# Altium PCB TIE_2025.PcbDoc (part 1 of 2)
Units mm, origin at the board's own origin, x right, y up, seen from the top; angles counter-clockwise.
Board outline 85 x 56.03 mm, 6 copper layers (Top Layer, L2-GND, L3-PWR, L4-SGN, L5-GND, Bottom Layer), stack 1.452 mm thick; 135 components, 108 nets, 850 pads, 109 vias.
Unrouted connection lines stored in the file: 482.
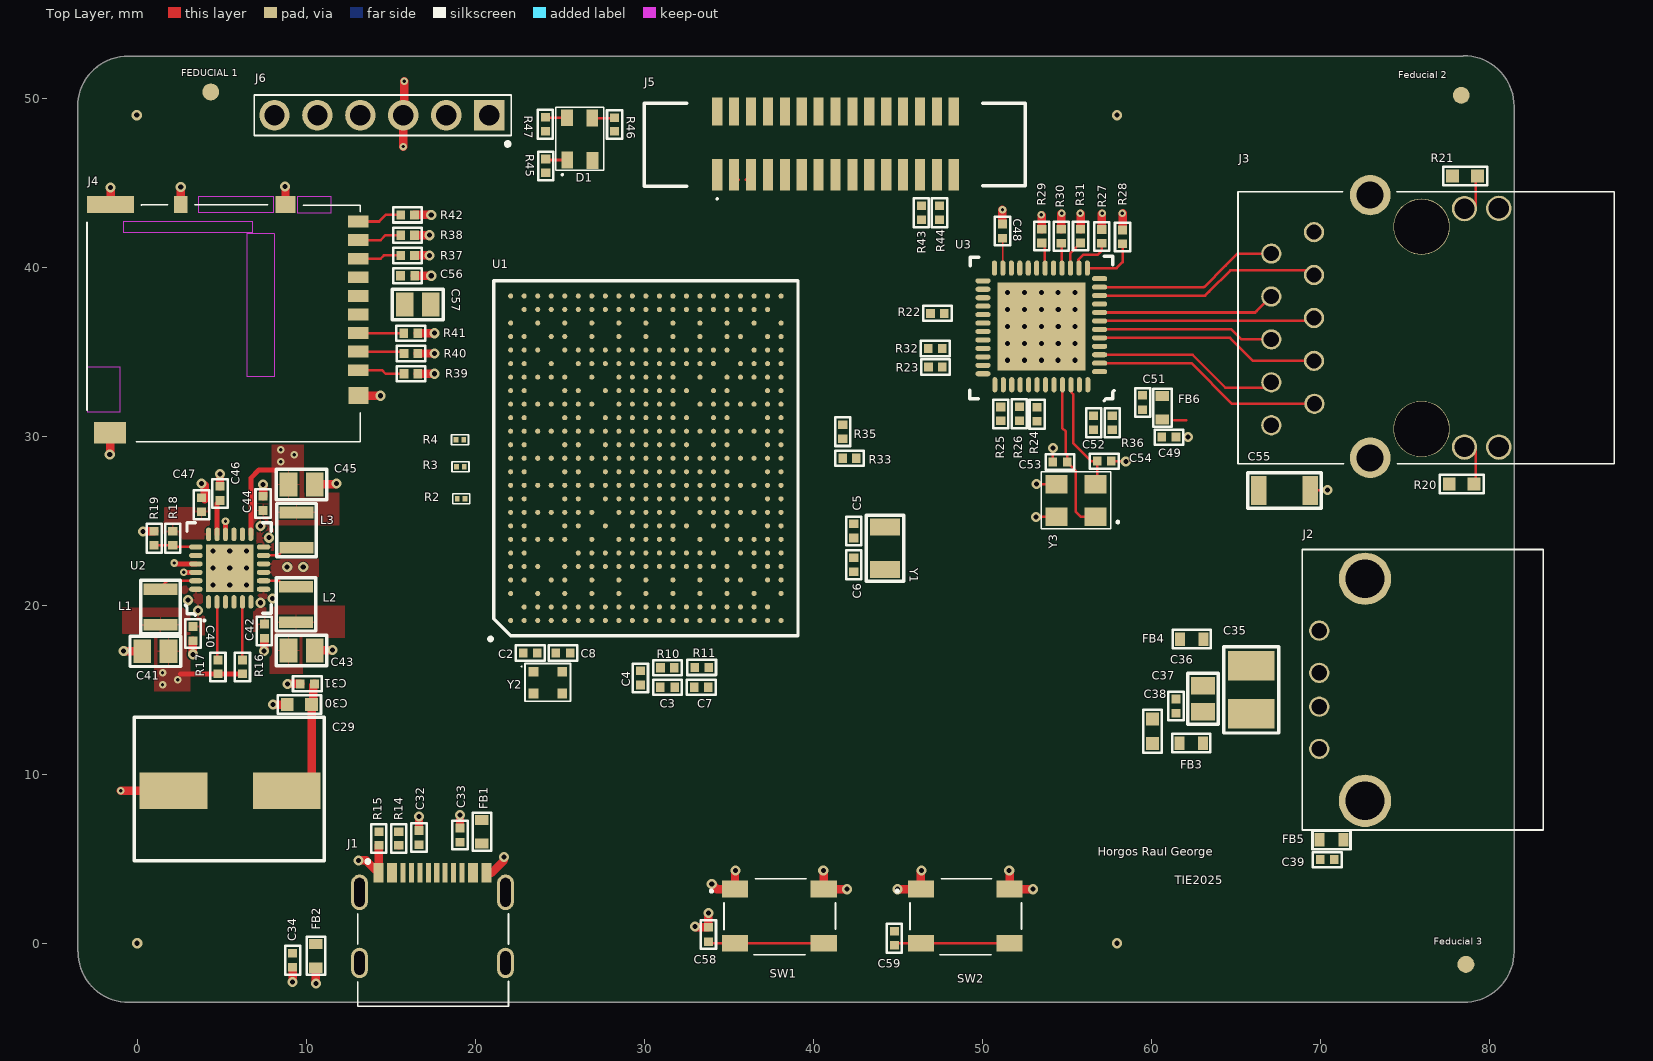
[diagram p0: Top Layer view]
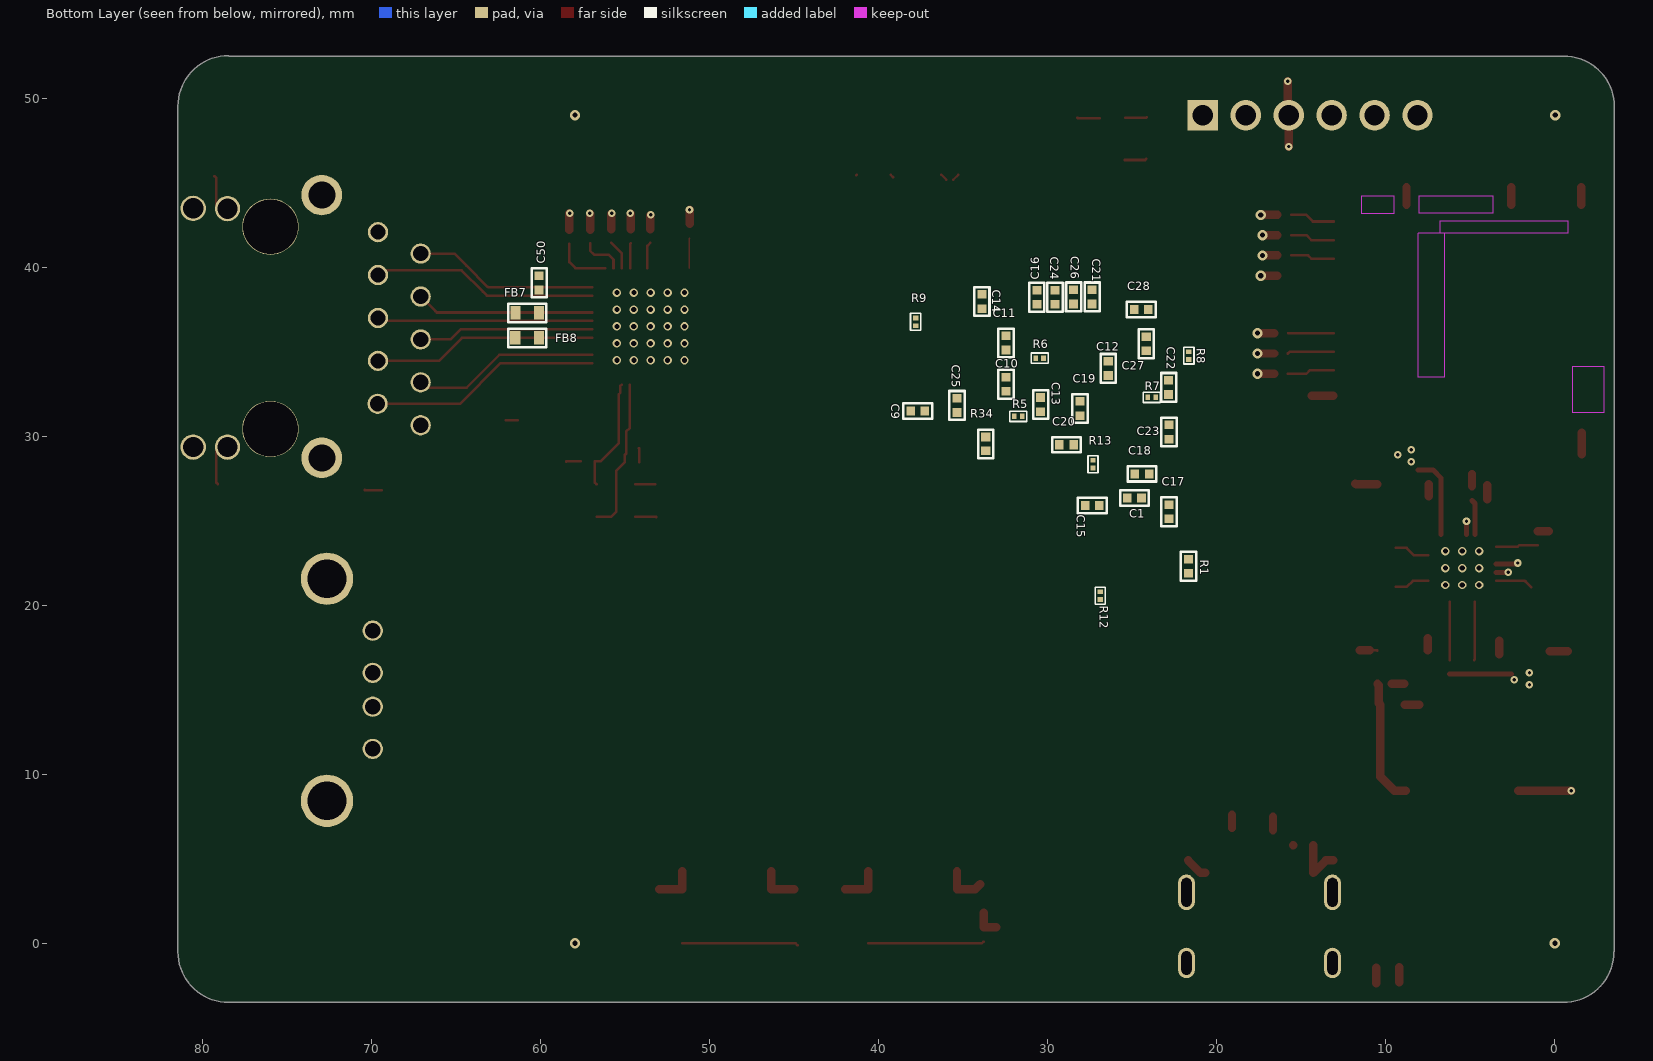
[diagram p1: Bottom Layer view, seen from below]
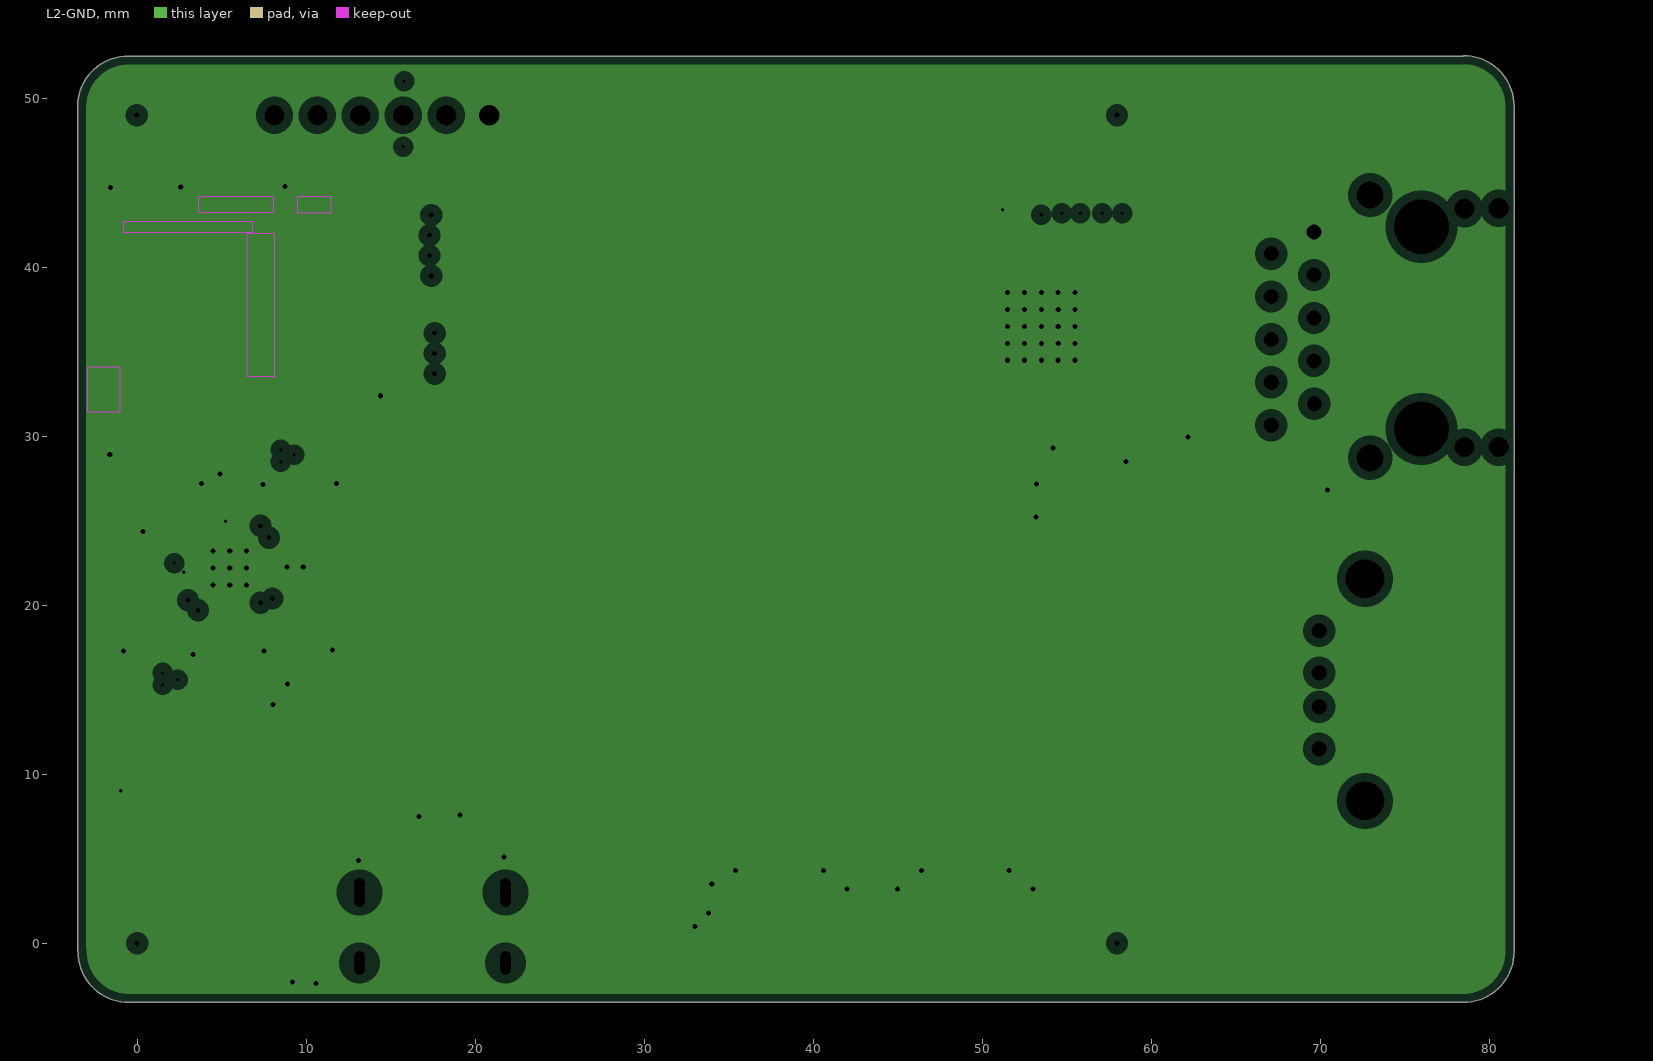
[diagram p2: L2-GND, clearances drawn from the general rule]
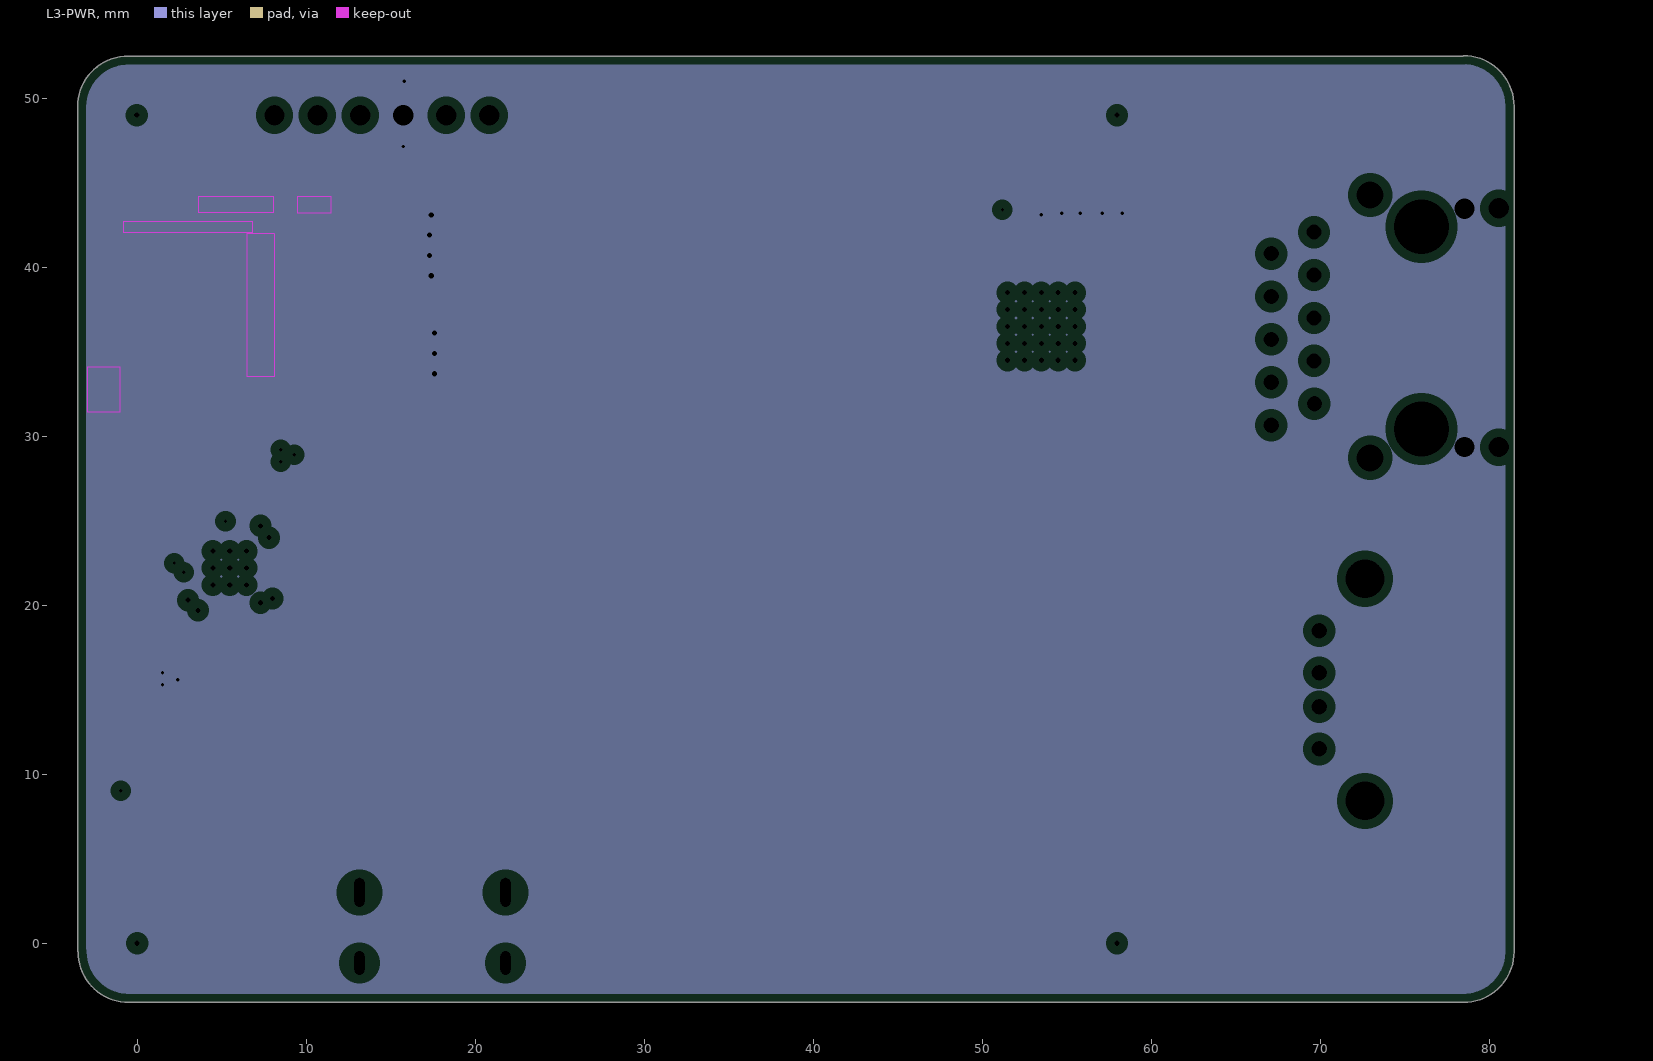
[diagram p3: L3-PWR, clearances drawn from the general rule]
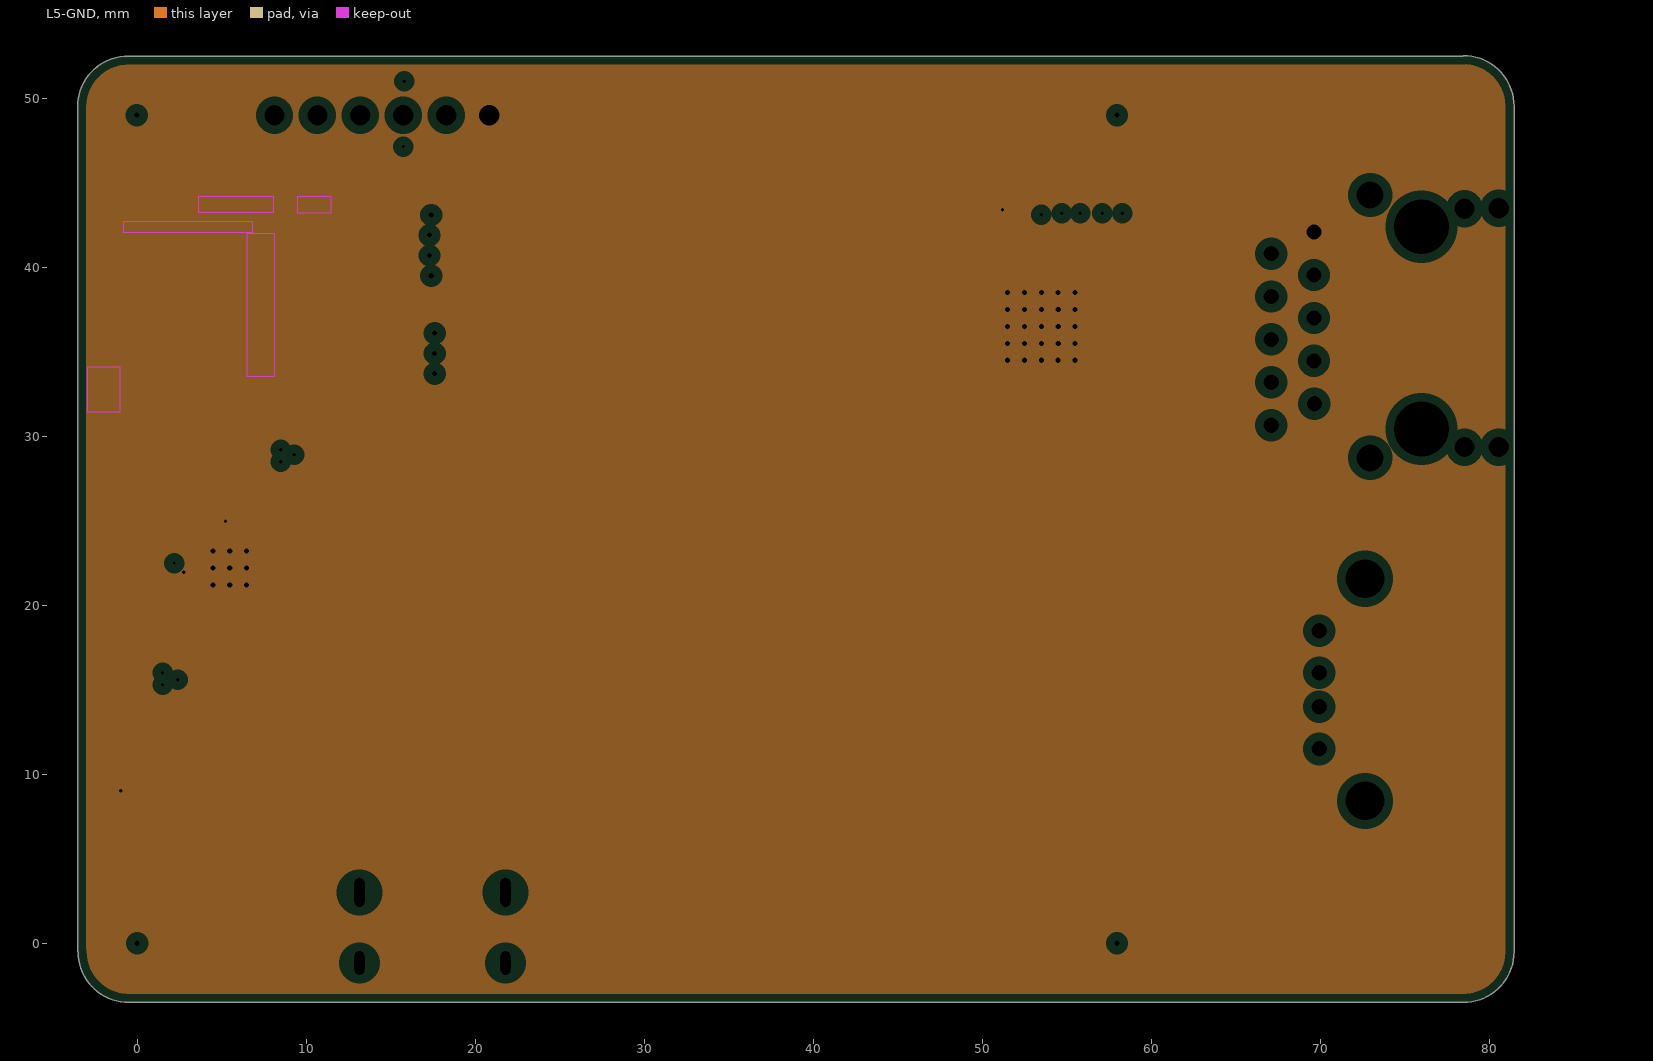
[diagram p4: L5-GND, clearances drawn from the general rule]

## Layer stack, top to bottom
Top Solder: solder mask 0.01, Solder Resist, Dk 3.5
Top Layer: signal copper 0.035
Dielectric 1: prepreg 0.1, PP-006, Dk 4.1
L2-GND: plane copper 0.018, net GND
Dielectric 2: core 0.1, PP-006, Dk 4.1
L3-PWR: plane copper 0.018, net (Multiple Nets)
Dielectric 3: prepreg 0.1, PP-006, Dk 4.1
Dielectric 4: prepreg 0.1, PP-006, Dk 4.1
Dielectric 5: core 0.51, PP-006, Dk 4.1
Dielectric 6: prepreg 0.1, PP-006, Dk 4.1
Dielectric 7: prepreg 0.1, PP-006, Dk 4.1
L4-SGN: signal copper 0.018
Dielectric 8: prepreg 0.1, PP-006, Dk 4.1
L5-GND: plane copper 0.018, net GND
Dielectric 9: prepreg 0.1, PP-006, Dk 4.1
Bottom Layer: signal copper 0.035
Bottom Solder: solder mask 0.01, Solder Resist, Dk 3.5

## Board outline
-3.525,-0.5 -3.525,49.5 cw(c-0.525,49.5) -0.525,52.5 78.475,52.5 78.475,52.525 cw(c78.475,49.525) 81.475,49.525 81.475,-0.5 cw(c78.475,-0.5) 78.475,-3.5 -0.5,-3.5 cw(c-0.5,-0.5) -3.5,-0.5

## Design rules (kind name [scope] priority, off if disabled: settings)
Clearance Clearance_BGA [WithinRoom('RoomBGA')] p1: gap=0.1 ignorepadtopadclearanceinfootprint=TRUE except(0.15: Arc-SMDPad Track-SMDPad; 0.2: Arc-Arc Arc-Track Track-Track)
Clearance Clearance_PWR_BGA [InNetClass('Power_BGA')] p2: gap=0.1 ignorepadtopadclearanceinfootprint=TRUE except(0: Arc-Hole Track-Hole SMDPad-Hole THPad-Hole Via-Hole Fill-Hole Poly-Hole Region-Hole Text-Hole)
Clearance Clearance_DIFF [InNetClass('ETHERNET')OR InNetClass('USB')] p3: gap=0.15 ignorepadtopadclearanceinfootprint=TRUE except(0: Arc-Hole Track-Hole SMDPad-Hole THPad-Hole Via-Hole Fill-Hole Poly-Hole Region-Hole Text-Hole; 0.1: Arc-Fill Arc-Poly Arc-Region Arc-Text Track-Fill Track-Poly Track-Region Track-Text THPad-Text Via-Text Fill-Text Poly-Text Region-Text Text-Text; 0.175: Arc-Arc Arc-Track Track-Track; 0.2: Arc-SMDPad Arc-Via Track-SMDPad Track-Via; 0.4: SMDPad-SMDPad)
Clearance [All] p4: gap=0.15 ignorepadtopadclearanceinfootprint=TRUE except(0: Arc-Hole Track-Hole SMDPad-Hole THPad-Hole Via-Hole Fill-Hole Poly-Hole Region-Hole Text-Hole; 0.1: Arc-Fill Arc-Poly Arc-Region Arc-Text Track-Fill Track-Poly Track-Region Track-Text THPad-Text Via-Text Fill-Text Poly-Text Region-Text Text-Text; 0.2: Arc-SMDPad Arc-Via Track-SMDPad Track-Via Via-Via Via-Fill Via-Poly Via-Region; 0.3: Arc-Arc Arc-Track Track-Track; 0.4: SMDPad-SMDPad)
DiffPairsRouting DiffPairRouting_Z50 [All] p1: maxlimit=0.254 minlimit=0.254 mostfreqgap=0.254 toplayer_minwidth=0.15 toplayer_maxwidth=0.15 toplayer_prefwidth=0.15 midlayer2_minwidth=0.15 midlayer2_maxwidth=0.15 midlayer2_prefwidth=0.15 bottomlayer_minwidth=0.15 bottomlayer_maxwidth=0.15 bottomlayer_prefwidth=0.15 maxuncoupledlength=12.7
DiffPairsRouting DiffPairsRouting_Z100 [InDifferentialPairClass('ETHERNET')] p2: maxlimit=0.175 minlimit=0.175 mostfreqgap=0.175 toplayer_minwidth=0.175 toplayer_maxwidth=0.175 toplayer_prefwidth=0.175 midlayer2_minwidth=0.175 midlayer2_maxwidth=0.175 midlayer2_prefwidth=0.175 bottomlayer_minwidth=0.175 bottomlayer_maxwidth=0.175 bottomlayer_prefwidth=0.175 maxuncoupledlength=12.7
DiffPairsRouting DiffPairsRouting_Z90 [InDifferentialPair('USBA')and InDifferentialPair('USBB')] p3: maxlimit=0.15 minlimit=0.15 mostfreqgap=0.15 toplayer_minwidth=0.15 toplayer_maxwidth=0.15 toplayer_prefwidth=0.15 midlayer2_minwidth=0.15 midlayer2_maxwidth=0.15 midlayer2_prefwidth=0.15 bottomlayer_minwidth=0.15 bottomlayer_maxwidth=0.15 bottomlayer_prefwidth=0.15 maxuncoupledlength=12.7
DiffPairsRouting [All] p4: maxlimit=0.254 minlimit=0.254 mostfreqgap=0.254 toplayer_minwidth=0.381 toplayer_maxwidth=0.381 toplayer_prefwidth=0.381 midlayer2_minwidth=0.381 midlayer2_maxwidth=0.381 midlayer2_prefwidth=0.381 bottomlayer_minwidth=0.381 bottomlayer_maxwidth=0.381 bottomlayer_prefwidth=0.381 maxuncoupledlength=12.7
FanoutControl Fanout_BGA [WithinRoom('RoomBGA')] p1: bgadir=Out bgaviamode=Centered fanoutstyle=BGA fanoutdirection=Alternating viagrid=0.025 // Fanout_BGA (Default Rule)
HoleSize [All] p1: absolutevalues=TRUE maxlimit=2.54 minlimit=0.015 maxpercent=80.000 minpercent=20.000
HoleToHoleClearance [All] p1: gap=0.2 allowstackedmicrovias=TRUE
MinimumSolderMaskSliver [All] p1: minsoldermaskwidth=0.05
PlaneClearance [All] p1: clearance=0.508
PlaneConnect [All] p1: planeconnectstyle=Relief reliefexpansion=0.508 reliefentries=4 reliefconductorwidth=0.254 reliefairgap=0.254
PolygonConnect [All] p1: connectstyle=Relief reliefconductorwidth=0.1 reliefentries=4 polygonreliefangle="90 Angle" airgapwidth=0.1
RoomDefinition RoomBGA [False] p1: confinementstyle=ConfineIn formatcopy=TRUE lockcomponents=FALSE outline 21.1,18.2 39,18.2 39,39.2 21.1,39.2
RoutingVias RoutingVias_BGA [WithinRoom('RoomBGA')] p1: holewidth=0.2 width=0.44 viastyle="Through Hole" minholewidth=0.2 minwidth=0.44 maxholewidth=0.2 maxwidth=0.44
RoutingVias [All] p2: holewidth=0.3 width=0.6 viastyle="Through Hole" minholewidth=0.2 minwidth=0.45 maxholewidth=0.3 maxwidth=0.6
SilkToSilkClearance [All] p1: silktosilkclearance=0.1
SilkToSolderMaskClearance [IsPad] p1: minsilkscreentomaskgap=0.1 clearancetoexposedcopper=TRUE
SolderMaskExpansion [All] p1: expansion=0.05 istentingtop=FALSE
SupplyNets "Schematic Supply Nets_15" [InNet('VDD_3V3')] p1: voltage=0.000
SupplyNets "Schematic Supply Nets_14" [InNet('VDDAH')] p2: voltage=0.000
SupplyNets "Schematic Supply Nets_13" [InNet('GND_USBB')] p3: voltage=0.000
SupplyNets "Schematic Supply Nets_12" [InNet('USBB_GND')] p4: voltage=0.000
SupplyNets "Schematic Supply Nets_11" [InNet('VDDAL')] p5: voltage=0.000
SupplyNets "Schematic Supply Nets_10" [InNet('5V_MAIN')] p6: voltage=0.000
SupplyNets "Schematic Supply Nets_9" [InNet('GND')] p7: voltage=0.000
SupplyNets "Schematic Supply Nets_8" [InNet('DDR_VREF')] p8: voltage=0.000
SupplyNets "Schematic Supply Nets_7" [InNet('VDD_2V5')] p9: voltage=0.000
SupplyNets "Schematic Supply Nets_6" [InNet('VDD_1V8')] p10: voltage=0.000
SupplyNets "Schematic Supply Nets_5" [InNet('USBA_VBUS_5V')] p11: voltage=0.000
SupplyNets "Schematic Supply Nets_4" [InNet('VDDAL_PLL')] p12: voltage=0.000
SupplyNets "Schematic Supply Nets_3" [InNet('VDDIODDR')] p13: voltage=0.000
SupplyNets "Schematic Supply Nets_2" [InNet('VDDCORE')] p14: voltage=0.000
SupplyNets "Schematic Supply Nets_1" [InNet('USBB_VBUS_5V')] p15: voltage=0.000
SupplyNets "Schematic Supply Nets" [InNet('GND_USBA')] p16: voltage=0.000
Width Width_50r [InNetClass('GMAC0')] p1: maxlimit=0.15 minlimit=0.15 preferedwidth=0.15
Width Width_BGA_Power [InNetClass('Power_BGA')] p2: maxlimit=1 minlimit=0.3 preferedwidth=0.3
Width Width_BGA [WithinRoom('RoomBGA')] p3: maxlimit=0.1 minlimit=0.1 preferedwidth=0.1
Width [All] p4: maxlimit=1 minlimit=0.1 preferedwidth=0.2
21 further rules are at their usual default settings.

## Classes and differential pairs
net class USB: USBA_N USBA_P USBB_N USBB_P
net class SD: SDMMC1_CD SDMMC1_CK SDMMC1_CMD SDMMC1_DAT0 SDMMC1_DAT1 SDMMC1_DAT2 SDMMC1_DAT3
net class MIPI: MIPI_CK_N MIPI_CK_P MIPI_D0_N MIPI_D0_P MIPI_D1_N MIPI_D1_P
net class GMAC0: GMAC0_IRQ GMAC0_MDC GMAC0_MDIO GMAC0_RX0 GMAC0_RX1 GMAC0_RX2 GMAC0_RX3 GMAC0_RXCK GMAC0_RXCTL GMAC0_TX0 GMAC0_TX1 GMAC0_TX2 GMAC0_TX3 GMAC0_TXEN GMACH0_TXCK
net class ETHERNET: TXRX_A_N TXRX_A_P TXRX_B_N TXRX_B_P TXRX_C_N TXRX_C_P TXRX_D_N TXRX_D_P
net class Power_BGA: DDR_VREF GND VDD_2V5 VDD_3V3 VDDCORE VDDIODDR
differential pair class MIPI_CSI: MIPI_CK MIPI_D0 MIPI_D1
component class USB: C29 C30 C31 C32 C33 C34 C35 C36 C37 C38 C39 FB1 FB2 FB3 FB4 FB5 J1 J2 R14 R15 "Title 4"
component class SDCard-MIPI-User: C56 C57 C58 C59 D1 J4 J5 J6 R37 R38 R39 R40 R41 R42 R43 R44 R45 R46 R47 SW1 SW2 "Title 6"
component class PMIC: C40 C41 C42 C43 C44 C45 C46 C47 L1 L2 L3 R16 R17 R18 R19 "Title 5" U2
component class MPU-System: C1 C2 C3 C4 C5 C6 C7 C8 R1 R2 R3 R4 R5 R6 R7 R8 R9 R10 R11 "Title 1" Y1 Y2
component class MPU-Power: C9 C10 C11 C12 C13 C14 C15 C16 C17 C18 C19 C20 C21 C22 C23 C24 C25 C26 C27 C28 R12 R13 "Title 2"
component class MPU-PIO: "Title 3" U1
component class Ethernet: C48 C49 C50 C51 C52 C53 C54 C55 FB6 FB7 J3 R20 R21 R22 R23 R24 R25 R26 R27 R28 R29 R30 R31 R32 R33 R34 R35 R36 "Title 7" U3 Y3
differential pair MIPI_D1: +MIPI_D1_P -MIPI_D1_N
differential pair MIPI_D0: +MIPI_D0_P -MIPI_D0_N
differential pair MIPI_CK: +MIPI_CK_P -MIPI_CK_N
differential pair USBB: +USBB_P -USBB_N
differential pair USBA: +USBA_P -USBA_N
differential pair TXRX_D: +TXRX_D_P -TXRX_D_N
differential pair TXRX_C: +TXRX_C_P -TXRX_C_N
differential pair TXRX_B: +TXRX_B_P -TXRX_B_N
differential pair TXRX_A: +TXRX_A_P -TXRX_A_N

## Components (designator, comment, footprint, x,y, rotation, side; value= is the part's Value field where it differs from the comment)
C1 "0.1uF" CAP0402 24.875,26.35 r0 bottom
C2 "10pF" CAP0402 23.255,17.175 r0 top
C3 "0.1uF" CAP0402 31.38,15.15 r180 top
C4 "4.7uF" CAP0402 29.775,15.7 r90 top
C5 "12pF" CAP0402 42.4,24.4 r270 top
C6 "12pF" CAP0402 42.4,22.4 r90 top
C7 "0.1uF" CAP0402 33.375,15.15 r180 top
C8 "10pF" CAP0402 25.195,17.175 r180 top
C9 "4.7uF" CAP0402 37.7,31.5 r180 bottom
C10 "4.7uF" CAP0402 32.475,33.08 r270 bottom
C11 "4.7uF" CAP0402 32.475,35.525 r90 bottom
C12 "4.7uF" CAP0402 26.425,34.02 r270 bottom
C13 "0.1uF" CAP0402 30.425,31.875 r90 bottom
C14 "0.1uF" CAP0402 33.9,37.975 r270 bottom
C15 "0.1uF" CAP0402 27.375,25.9 r180 bottom
C16 "0.1uF" CAP0402 30.65,38.225 r270 bottom
C17 "0.1uF" CAP0402 22.832,25.532 r90 bottom
C18 "2.2uF" CAP0402 24.425,27.775 r0 bottom
C19 "0.1uF" CAP0402 28.1,31.645 r270 bottom
C20 "0.1uF" CAP0402 28.895,29.5 r180 bottom
C21 "0.1uF" CAP0402 27.375,38.25 r270 bottom
C22 "0.1uF" CAP0402 22.85,32.895 r270 bottom
C23 "0.1uF" CAP0402 22.825,30.255 r90 bottom
C24 "0.1uF" CAP0402 29.575,38.225 r270 bottom
C25 "0.1uF" CAP0402 35.375,31.83 r270 bottom
C26 "0.1uF" CAP0402 28.475,38.25 r270 bottom
C27 "0.1uF" CAP0402 24.175,35.475 r90 bottom
C28 "0.1uF" CAP0402 24.475,37.5 r180 bottom
C29 "330uF" "CAP ALU" 5.5,9 r180 top locked
C30 "10uF" CAP0603 9.6,14.125 r0 top
C31 "0.1uF" CAP0402 10.07,15.35 r0 top
C32 "470pF" CAP0402 16.675,6.255 r270 top
C33 "470pF" CAP0402 19.1,6.4 r270 top
C34 "0.1uF" CAP0402 9.2,-1 r270 top
C35 "100uF" CAP1210 65.917,14.994 r270 top
C36 "22uF" CAP0805 63.067,14.469 r270 top
C37 "0.1uF" CAP0402 61.465,14.034 r270 top
C38 "10uF" CAP0603 60.075,12.55 r270 top
C39 "0.1uF" CAP0402 70.416,4.947 r180 top
C40 "4.7uF" CAP0402 3.3,18.325 r90 top
C41 "22uF" CAP0805 1.075,17.275 r180 top
C42 "4.7uF" CAP0402 7.525,18.475 r90 top
C43 "22uF" CAP0805 9.725,17.325 r0 top
C44 "4.7uF" CAP0402 7.45,26.03 r270 top
C45 "22uF" CAP0805 9.725,27.15 r0 top
C46 "4.7uF" CAP0402 4.9,26.62 r270 top
C47 "4.7uF" CAP0402 3.8,25.95 r270 top
C48 "0.1uF" CAP0402 51.2,42.145 r270 top
C49 "0.1uF" CAP0402 61.05,29.95 r0 top
C50 "0.1uF" CAP0402 60.1,39.08 r90 bottom
C51 "0.1uF" CAP0402 59.5,32 r90 top
C52 "0.1uF" CAP0402 56.6,30.8 r270 top
C53 "10pF" CAP0402 54.605,28.475 r0 top
C54 "10pF" CAP0402 57.225,28.525 r180 top
C55 "1000pF" CAP1206 67.899,26.8 r180 top
C56 "0.1uF" CAP0402 16,39.5 r0 top
C57 "22uF" CAP0805 16.6,37.8 r180 top
C58 "2.2uF" CAP0402 33.8,0.52 r270 top
C59 "0.1uF" CAP0402 44.8,0.3 r270 top
D1 "APT1608SRCPRV" CLV1A-FKB-CK1VW1DE1BB7C3C3 25.975,47.5 r90 top
FB1 "120R" FB0603 20.4,6.6 r90 top
FB2 "120R" FB0603 10.575,-0.75 r270 top
FB3 "120R" FB0603 62.372,11.848 r180 top
FB4 "120R" FB0603 62.4,18 r180 top
FB5 "120R" FB0603 70.671,6.116 r180 top
FB6 "120R" FB0603 60.661,31.689 r270 top
FB7 "120R" FB0603 60.8,37.3 r0 bottom
FB8 "120R" FB0603 60.812,35.825 r180 bottom
"FEDUCIAL 1" "Comment" TestPoint 4.35,50.375 r0 top
"Feducial 2" "Comment" TestPoint 78.35,50.175 r0 top
"Feducial 3" "Comment" TestPoint 78.625,-1.25 r0 top
J1 "USB2.0 TYPE-C FEMALE" USB4105-GF-A 17.475,1.5 r0 top locked
J2 "USB2.0 STD-A FEMALE" 292303-1 76,15 r90 top
J3 "JXD1-0019NL" JXD1-0019NL 76,36.5 r90 top locked
J4 "DM3AT-SF-PEJM5" DM3AT-SF-PEJM5 5.5,36.96 r270 top locked
J5 "FPC 15P Female" 1-1734248-5_1 41.5,47.5 r180 top locked
J6 "HDR-2.54 Male 1x6" 68001-106HLF 14.525,49 r180 top locked
L1 "1.5uH" INDUCTOR1008 1.375,19.9 r270 top
L2 "1.5uH" INDUCTOR1008 9.4,20.05 r270 top
L3 "1.5uH" INDUCTOR1008 9.425,24.45 r90 top
R1 "10k" RES0402 21.675,22.315 r270 bottom
R2 "200R" RES0201 19.17,26.3 r180 top
R3 "200R" RES0201 19.13,28.2 r180 top
R4 "200R" RES0201 19.1,29.8 r180 top
R5 "16.9k" RES0201 31.75,31.175 r180 bottom
R6 "16.9k" RES0201 30.48,34.625 r180 bottom
R7 "16.9k" RES0201 23.85,32.3 r0 bottom
R8 "16.9k" RES0201 21.65,34.775 r270 bottom
R9 "4.02k" RES0201 37.825,36.775 r90 bottom
R10 "1k" RES0402 31.375,16.3 r180 top
R11 "1k" RES0402 33.4,16.325 r180 top
R12 "240R" RES0201 26.9,20.57 r270 bottom
R13 "240R" RES0201 27.325,28.35 r90 bottom
R14 "10k" RES0402 15.475,6.2 r270 top
R15 "10k" RES0402 14.3,6.2 r90 top
R16 "10k" RES0402 6.225,16.35 r270 top
R17 "10k" RES0402 4.775,16.35 r270 top
R18 "47k" RES0402 2.103,23.972 r90 top
R19 "47k" RES0402 1.003,23.972 r90 top
R20 "330R" RES0603 78.375,27.175 r0 top
R21 "330R" RES0603 78.575,45.4 r0 top
R22 "10k" RES0402 47.35,37.275 r180 top
R23 "10k" RES0402 47.235,34.1 r180 top
R24 "10k" RES0402 53.25,31.308 r90 top
R25 "10k" RES0402 51.1,31.325 r270 top
R26 "10k" RES0402 52.2,31.335 r270 top
R27 "10k" RES0402 57.075,41.825 r90 top
R28 "10k" RES0402 58.309,41.797 r90 top
R29 "10k" RES0402 53.525,41.85 r90 top
R30 "10k" RES0402 54.677,41.835 r90 top
R31 "10k" RES0402 55.825,41.85 r90 top
R32 "1k" RES0402 47.225,35.2 r0 top
R33 "1k" RES0402 42.15,28.7 r180 top
R34 "1k" RES0402 33.675,29.55 r90 bottom
R35 "1k" RES0402 41.75,30.275 r270 top
R36 "6.04k" RES0402 57.7,30.8 r90 top
R37 "47k" RES0402 16,40.7 r0 top
R38 "47k" RES0402 16,41.9 r0 top
R39 "47k" RES0402 16.2,33.7 r0 top
R40 "47k" RES0402 16.2,34.9 r0 top
R41 "47k" RES0402 16.19,36.1 r0 top
R42 "47k" RES0402 16,43.1 r0 top
R43 "2.2k" RES0402 46.4,43.225 r90 top
R44 "2.2k" RES0402 47.475,43.225 r90 top
R45 "1k" RES0402 24.175,46 r90 top
R46 "1k" RES0402 28.25,48.45 r90 top
R47 "1k" RES0402 24.15,48.46 r90 top
SW1 "PTS647" "PTS 647 SK38 SMTR2 LFS" 38,1.6 r0 top locked
SW2 "PTS647" "PTS 647 SK38 SMTR2 LFS" 49,1.6 r0 top locked
U1 "SAMA7G54DG-I/4UB" BGA427C80P25X21_2100X1800X120 30.1,28.7 r90 top
U2 "MCP16501TA-E/RMB" QFN-24 5.475,22.2 r90 top
U3 "LAN8840-V/PSA" QFN-48 53.5,36.5 r180 top locked
Y1 "32.768kHZ" VMK4-1EE-12-32K7680000TR 44.3,23.352 r270 top
Y2 "24MHz" VXM8-9016-24M0000000 24.3,15.425 r0 top
Y3 "50MHz" VXM7-1362-50M0000000 55.55,26.2 r180 top

## Footprints (in the part's own frame and the unit in brackets; to place one, negate y for a bottom-side part, rotate by r counter-clockwise, add the part's x,y. Pads: shape width x height; smd on the part's side, far side on the other; paste and mask are expansions set on the pad)
1-1734248-5_1 [mm] "CON FPC 1mm 15P Female SMD VERT"
  rect 0.6x1.85 smd: 1(7.178,2.023) 2(6.178,2.023) 3(5.178,2.023) 4(4.178,2.023) 5(3.178,2.023) 6(2.178,2.023) 7(1.178,2.023) 8(0.178,2.023) 9(-0.822,2.023) 10(-1.822,2.023) 11(-2.822,2.023) 12(-3.822,2.023) 13(-4.822,2.023) 14(-5.822,2.023) 15(-6.822,2.023)
  rect 0.6x1.65 smd: ""(-6.822,-1.727) ""(-5.822,-1.727) ""(-4.822,-1.727) ""(-3.822,-1.727) ""(-2.822,-1.727) ""(-1.822,-1.727) ""(-0.822,-1.727) ""(0.178,-1.727) ""(1.178,-1.727) ""(2.178,-1.727) ""(3.178,-1.727) ""(4.178,-1.727) ""(5.178,-1.727) ""(6.178,-1.727) ""(7.178,-1.727)
  silkscreen extent -11.05,-2.2 11.5,3.5, body extent -11.02,-2.24 11.38,2.61, height 5.68
68001-106HLF [mm]
  rect 1.8x1.8 hole 1.2: 1(-6.3,0)
  round 1.8 hole 1.2: 2(-3.76,0) 3(-1.22,0) 4(1.32,0) 5(3.86,0) 6(6.4,0)
  silkscreen extent -7.6,-1.2 7.6,1.8, body extent -7.62,-1.21 7.62,1.2, height 8.18
292303-1 [mm]
  round 3.1 hole 2.3 mask+0.1: 0(-6.57,3.345) 0(6.57,3.345)
  round 1.2 hole 0.92 mask+0.1: 1(-3.5,6.055) 2(-1,6.055) 3(1,6.055) 4(3.5,6.055)
  silkscreen extent -8.3,-7.2 8.3,7.07, body extent -8.12,-7.1 8.12,6.9, height 8.62
BGA427C80P25X21_2100X1800X120 [mm]
  round 0.3 smd mask+0.05: A1(-9.6,8) A3(-8,8) A4(-7.2,8) A5(-6.4,8) A6(-5.6,8) A7(-4.8,8) A8(-4,8) A9(-3.2,8) A10(-2.4,8) A11(-1.6,8) A12(-0.8,8) A13(0,8) A14(0.8,8) A15(1.6,8) A16(2.4,8) A17(3.2,8) A18(4,8) A19(4.8,8) A20(5.6,8) A21(6.4,8) A22(7.2,8) A23(8,8) A25(9.6,8) AA1(-9.6,-8) AA3(-8,-8) AA4(-7.2,-8) AA5(-6.4,-8) AA6(-5.6,-8) AA7(-4.8,-8) AA8(-4,-8) AA9(-3.2,-8) AA10(-2.4,-8) AA11(-1.6,-8) AA12(-0.8,-8) AA13(0,-8) AA14(0.8,-8) AA15(1.6,-8) AA16(2.4,-8) AA17(3.2,-8) AA18(4,-8) AA19(4.8,-8) AA20(5.6,-8) AA21(6.4,-8) AA22(7.2,-8) AA23(8,-8) AA25(9.6,-8) B1(-9.6,7.2) B2(-8.8,7.2) B4(-7.2,7.2) B5(-6.4,7.2) B6(-5.6,7.2) B7(-4.8,7.2) B8(-4,7.2) B9(-3.2,7.2) B10(-2.4,7.2) B11(-1.6,7.2) B12(-0.8,7.2) B13(0,7.2) B14(0.8,7.2) B15(1.6,7.2) B16(2.4,7.2) B17(3.2,7.2) B18(4,7.2) B19(4.8,7.2) B20(5.6,7.2) B21(6.4,7.2) B22(7.2,7.2) B24(8.8,7.2) B25(9.6,7.2) C1(-9.6,6.4) C2(-8.8,6.4) C3(-8,6.4) C5(-6.4,6.4) C7(-4.8,6.4) C9(-3.2,6.4) C11(-1.6,6.4) C13(0,6.4) C15(1.6,6.4) C17(3.2,6.4) C19(4.8,6.4) C21(6.4,6.4) C23(8,6.4) C24(8.8,6.4) C25(9.6,6.4) D1(-9.6,5.6) D2(-8.8,5.6) D4(-7.2,5.6) D7(-4.8,5.6) D9(-3.2,5.6) D11(-1.6,5.6) D13(0,5.6) D15(1.6,5.6) D17(3.2,5.6) D19(4.8,5.6) D20(5.6,5.6) D22(7.2,5.6) D24(8.8,5.6) D25(9.6,5.6) E1(-9.6,4.8) E2(-8.8,4.8) E3(-8,4.8) E4(-7.2,4.8) E5(-6.4,4.8) E7(-4.8,4.8) E8(-4,4.8) E9(-3.2,4.8) E10(-2.4,4.8) E11(-1.6,4.8) E12(-0.8,4.8) E13(0,4.8) E14(0.8,4.8) E15(1.6,4.8) E16(2.4,4.8) E17(3.2,4.8) E18(4,4.8) E19(4.8,4.8) E21(6.4,4.8) E22(7.2,4.8) E23(8,4.8) E24(8.8,4.8) E25(9.6,4.8) F1(-9.6,4) F2(-8.8,4) F5(-6.4,4) F6(-5.6,4) F8(-4,4) F9(-3.2,4) F10(-2.4,4) F11(-1.6,4) F12(-0.8,4) F13(0,4) F14(0.8,4) F15(1.6,4) F16(2.4,4) F17(3.2,4) F18(4,4) F20(5.6,4) F21(6.4,4) F24(8.8,4) F25(9.6,4) G1(-9.6,3.2) G2(-8.8,3.2) G3(-8,3.2) G4(-7.2,3.2) G5(-6.4,3.2) G6(-5.6,3.2) G7(-4.8,3.2) G9(-3.2,3.2) G11(-1.6,3.2) G13(0,3.2) G15(1.6,3.2) G17(3.2,3.2) G19(4.8,3.2) G20(5.6,3.2) G21(6.4,3.2) G22(7.2,3.2) G23(8,3.2) G24(8.8,3.2) G25(9.6,3.2) H1(-9.6,2.4) H2(-8.8,2.4) H5(-6.4,2.4) H6(-5.6,2.4) H8(-4,2.4) H10(-2.4,2.4) H11(-1.6,2.4) H12(-0.8,2.4) H13(0,2.4) H14(0.8,2.4) H15(1.6,2.4) H16(2.4,2.4) H18(4,2.4) H20(5.6,2.4) H21(6.4,2.4) H24(8.8,2.4) H25(9.6,2.4) J1(-9.6,1.6) J2(-8.8,1.6) J3(-8,1.6) J4(-7.2,1.6) J5(-6.4,1.6) J6(-5.6,1.6) J7(-4.8,1.6) J9(-3.2,1.6) J10(-2.4,1.6) J11(-1.6,1.6) J12(-0.8,1.6) J13(0,1.6) J14(0.8,1.6) J15(1.6,1.6) J16(2.4,1.6) J17(3.2,1.6) J18(4,1.6) J19(4.8,1.6) J20(5.6,1.6) J21(6.4,1.6) J22(7.2,1.6) J23(8,1.6) J24(8.8,1.6) J25(9.6,1.6) K1(-9.6,0.8) K2(-8.8,0.8) K5(-6.4,0.8) K6(-5.6,0.8) K7(-4.8,0.8) K8(-4,0.8) K9(-3.2,0.8) K10(-2.4,0.8) K11(-1.6,0.8) K12(-0.8,0.8) K13(0,0.8) K14(0.8,0.8) K15(1.6,0.8) K16(2.4,0.8) K17(3.2,0.8) K18(4,0.8) K19(4.8,0.8) K20(5.6,0.8) K21(6.4,0.8) K24(8.8,0.8) K25(9.6,0.8) L1(-9.6,0) L2(-8.8,0) L3(-8,0) L4(-7.2,0) L5(-6.4,0) L6(-5.6,0) L7(-4.8,0) L8(-4,0) L9(-3.2,0) L10(-2.4,0) L11(-1.6,0) L12(-0.8,0) L13(0,0) L14(0.8,0) L15(1.6,0) L16(2.4,0) L17(3.2,0) L18(4,0) L19(4.8,0) L20(5.6,0) L21(6.4,0) L22(7.2,0) L23(8,0) L24(8.8,0) L25(9.6,0) M1(-9.6,-0.8) M2(-8.8,-0.8) M5(-6.4,-0.8) M6(-5.6,-0.8) M7(-4.8,-0.8) M8(-4,-0.8) M9(-3.2,-0.8) M10(-2.4,-0.8) M11(-1.6,-0.8) M12(-0.8,-0.8) M13(0,-0.8) M14(0.8,-0.8) M15(1.6,-0.8) M16(2.4,-0.8) M17(3.2,-0.8) M18(4,-0.8) M19(4.8,-0.8) M20(5.6,-0.8) M21(6.4,-0.8) M24(8.8,-0.8) M25(9.6,-0.8) N1(-9.6,-1.6) N2(-8.8,-1.6) N3(-8,-1.6) N4(-7.2,-1.6) N5(-6.4,-1.6) N6(-5.6,-1.6) N7(-4.8,-1.6) N8(-4,-1.6) N9(-3.2,-1.6) N10(-2.4,-1.6) N11(-1.6,-1.6) N12(-0.8,-1.6) N13(0,-1.6) N14(0.8,-1.6) N15(1.6,-1.6) N16(2.4,-1.6) N17(3.2,-1.6) N18(4,-1.6) N19(4.8,-1.6) N20(5.6,-1.6) N21(6.4,-1.6) N22(7.2,-1.6) N23(8,-1.6) N24(8.8,-1.6) N25(9.6,-1.6) P1(-9.6,-2.4) P2(-8.8,-2.4) P5(-6.4,-2.4) P6(-5.6,-2.4) P8(-4,-2.4) P10(-2.4,-2.4) P11(-1.6,-2.4) P12(-0.8,-2.4) P13(0,-2.4) P14(0.8,-2.4) P15(1.6,-2.4) P16(2.4,-2.4) P18(4,-2.4) P20(5.6,-2.4) P21(6.4,-2.4) P24(8.8,-2.4) P25(9.6,-2.4) R1(-9.6,-3.2) R2(-8.8,-3.2) R3(-8,-3.2) R4(-7.2,-3.2) R5(-6.4,-3.2) R6(-5.6,-3.2) R7(-4.8,-3.2) R9(-3.2,-3.2) R10(-2.4,-3.2) R11(-1.6,-3.2) R12(-0.8,-3.2) R13(0,-3.2) R15(1.6,-3.2) R17(3.2,-3.2) R19(4.8,-3.2) R20(5.6,-3.2) R21(6.4,-3.2) R22(7.2,-3.2) R23(8,-3.2) R24(8.8,-3.2) R25(9.6,-3.2) T1(-9.6,-4) T2(-8.8,-4) T5(-6.4,-4) T6(-5.6,-4) T8(-4,-4) T9(-3.2,-4) T10(-2.4,-4) T11(-1.6,-4) T12(-0.8,-4) T13(0,-4) T14(0.8,-4) T15(1.6,-4) T16(2.4,-4) T17(3.2,-4) T18(4,-4) T20(5.6,-4) T21(6.4,-4) T24(8.8,-4) T25(9.6,-4) U1(-9.6,-4.8) U2(-8.8,-4.8) U3(-8,-4.8) U4(-7.2,-4.8) U5(-6.4,-4.8) U7(-4.8,-4.8) U8(-4,-4.8) U9(-3.2,-4.8) U10(-2.4,-4.8) U11(-1.6,-4.8) U12(-0.8,-4.8) U13(0,-4.8) U14(0.8,-4.8) U15(1.6,-4.8) U16(2.4,-4.8) U17(3.2,-4.8) U18(4,-4.8) U19(4.8,-4.8) U21(6.4,-4.8) U22(7.2,-4.8) U23(8,-4.8) U24(8.8,-4.8) U25(9.6,-4.8) V1(-9.6,-5.6) V2(-8.8,-5.6) V4(-7.2,-5.6) V6(-5.6,-5.6) V7(-4.8,-5.6) V9(-3.2,-5.6) V11(-1.6,-5.6) V13(0,-5.6) V15(1.6,-5.6) V17(3.2,-5.6) V19(4.8,-5.6) V20(5.6,-5.6) V22(7.2,-5.6) V24(8.8,-5.6) V25(9.6,-5.6) W1(-9.6,-6.4) W2(-8.8,-6.4) W3(-8,-6.4) W5(-6.4,-6.4) W6(-5.6,-6.4) W7(-4.8,-6.4) W9(-3.2,-6.4) W11(-1.6,-6.4) W13(0,-6.4) W15(1.6,-6.4) W17(3.2,-6.4) W19(4.8,-6.4) W20(5.6,-6.4) W21(6.4,-6.4) W23(8,-6.4) W24(8.8,-6.4) W25(9.6,-6.4) Y1(-9.6,-7.2) Y2(-8.8,-7.2) Y4(-7.2,-7.2) Y5(-6.4,-7.2) Y6(-5.6,-7.2) Y7(-4.8,-7.2) Y8(-4,-7.2) Y9(-3.2,-7.2) Y10(-2.4,-7.2) Y11(-1.6,-7.2) Y12(-0.8,-7.2) Y13(0,-7.2) Y14(0.8,-7.2) Y15(1.6,-7.2) Y16(2.4,-7.2) Y17(3.2,-7.2) Y18(4,-7.2) Y19(4.8,-7.2) Y20(5.6,-7.2) Y21(6.4,-7.2) Y22(7.2,-7.2) Y24(8.8,-7.2) Y25(9.6,-7.2)
  silkscreen extent -10.79,-9 10.5,9.29, body extent -10.56,-8.99 10.44,9.01, height 1.2
CAP0402 [mm]
  rect 0.51x0.535 smd mask+0.05: 1(-0.42,0) 2(0.42,0)
  silkscreen extent -0.85,-0.45 0.85,0.45, body extent -0.51,-0.25 0.51,0.25, height 0.51
CAP0603 [mm]
  rect 0.76x0.76 smd mask+0.05: 1(-0.72,0) 2(0.72,0)
  silkscreen extent -1.28,-0.55 1.28,0.55, body extent -0.8,-0.4 0.8,0.4, height 0.8
CAP0805 [mm]
  rect 1.05x1.4 smd mask+0.05: 1(-0.775,0) 2(0.775,0)
  silkscreen extent -1.5,-0.9 1.5,0.9, body extent -1,-0.62 1,0.63, height 1.26
CAP1206 [mil]
  rect 35.98x67.01 smd mask+1.97: 1(-60,0) 2(60,0)
  silkscreen extent -86,-41 86,41, body extent -63,-31 63,31, height 65
CAP1210 [mm]
  rect 1.75x2.75 smd paste+0 mask+0.102: 1(-1.425,0) 2(1.425,0)
  silkscreen extent -2.55,-1.63 2.55,1.63, body extent -1.6,-1.25 1.6,1.25, height 2.8
"CAP ALU" [mm]
  rect 4x2.15 smd: 1(-3.35,-0.025) 2(3.35,-0.025)
  silkscreen extent -5.56,-4.37 5.66,4.12, body extent -4.65,-4.28 4.65,4.22, height 10.5
CLV1A-FKB-CK1VW1DE1BB7C3C3 [mm]
  rect 1x0.7 smd mask+0.05: 1(-1.15,0.525) 2(-1.175,-0.975) 3(1.325,-0.95) 4(1.35,0.55)
  silkscreen extent -2.07,-1.63 1.97,1.2, body extent -1.65,-1.63 1.85,1.17, height 2.1
DM3AT-SF-PEJM5 [mm]
  rect 1x1.2 smd: G1(-6.75,3.275) G5(4.55,7.6)
  rect 1x0.8 smd: G2(-6.75,-2.925)
  rect 1x2.8 smd: G3(-6.75,-7.075)
  rect 0.7x1.2 smd: G4(-5.75,7.572) P1(3.05,7.572) P2(1.95,7.572) P3(0.85,7.572) P4(-0.25,7.572) P5(-1.35,7.572) P6(-2.45,7.572) P7(-3.55,7.572) P8(-4.65,7.572)
  rect 1.3x1.9 smd: G6(6.75,-7.1)
  Keep-Out Layer region: -7.245,2.55 -6.255,2.55 -6.255,-1.87 -7.245,-1.87
  Keep-Out Layer region: -7.241,5.966 -6.25,5.966 -6.25,4.003 -7.241,3.997
  Keep-Out Layer region: -5.065,2.575 -5.039,2.6 3.45,2.6 3.45,1 3.114,1 -5.065,1
  Keep-Out Layer region: -5.777,1.3 -5.073,1.3 -5.073,-6.3 -5.777,-6.3
  Keep-Out Layer region: 2.85,-6.525 5.55,-6.525 5.55,-8.425 2.85,-8.425
  silkscreen extent -6.74,-8.47 7.29,7.7, body extent -6.72,-8.4 7.22,7.75, height 1.64
FB0603 [mm]
  rect 0.6x0.8 smd mask+0.05: 1(-0.7,0) 2(0.7,0)
  silkscreen extent -1.12,-0.55 1.12,0.55, body extent -0.8,-0.4 0.8,0.4, height 0.46
INDUCTOR1008 [mm]
  rect 0.7x2 smd mask+0.05: 1(-1.05,0) 2(1.05,0)
  silkscreen extent -1.58,-1.17 1.58,1.17, body extent -1.25,-1 1.25,1, height 1.2
JXD1-0019NL [mm]
  round 2.4 hole 1.6 mask+0.05: 0(-7.775,3.039) 0(7.775,3.039)
  round 1.2 hole 0.9 mask+0.05: 1(5.582,6.364) 2(4.312,8.889) 3(3.042,6.364) 4(1.772,8.889) 5(0.502,6.364) 6(-0.768,8.889) 7(-2.038,6.364) 8(-3.308,8.889) 9(-4.578,6.339) 10(-5.848,8.889)
  round 1.5 hole 1.2 mask+0.05: 11(6.972,-2.541) 12(6.987,-4.571) 13(-7.138,-2.541) 14(-7.138,-4.571)
  round 3.33 hole 3.25 unplated mask+0.05: ""(-6.068,-0.001) ""(5.902,-0.001)
  silkscreen extent -8.13,-11.41 7.98,10.87, body extent -8.15,-11.36 7.9,10.89, height 13.7
"PTS 647 SK38 SMTR2 LFS" [mm]
  rect 1.55x1 smd mask+0.05: 1(-2.625,1.6) 2(2.625,1.6) 3(-2.625,-1.6) 4(2.625,-1.6)
  silkscreen extent -4.08,-2.27 3.32,2.22, body extent -3.22,-2.28 3.28,2.22, height 3.8
QFN-24 [mm]
  oval 0.8x0.3 smd mask+0.05: 1(-2,1.25) 2(-2,0.75) 3(-2,0.25) 4(-2,-0.25) 5(-2,-0.75) 6(-2,-1.25) 13(2,-1.25) 14(2,-0.75) 15(2,-0.25) 16(2,0.25) 17(2,0.75) 18(2,1.25)
  oval 0.3x0.8 smd mask+0.05: 7(-1.25,-2) 8(-0.75,-2) 9(-0.25,-2) 10(0.25,-2) 11(0.75,-2) 12(1.25,-2) 19(1.25,2) 20(0.75,2) 21(0.25,2) 22(-0.25,2) 23(-0.75,2) 24(-1.25,2)
  rect 2.8x2.8 smd mask+0.05: 25(0,0)
  silkscreen extent -3.12,-2.45 2.68,2.64, body extent -1.8,-1.8 1.8,1.8, height 0.8
QFN-48 [mm]
  oval 0.9x0.3 smd mask+0.05: 1(-3.45,2.675) 2(-3.45,2.175) 3(-3.45,1.675) 4(-3.45,1.175) 5(-3.45,0.675) 6(-3.45,0.175) 7(-3.45,-0.325) 8(-3.45,-0.825) 9(-3.45,-1.325) 10(-3.45,-1.825) 11(-3.45,-2.325) 12(-3.45,-2.825) 25(3.45,-2.7) 26(3.45,-2.2) 27(3.45,-1.7) 28(3.45,-1.2) 29(3.45,-0.7) 30(3.45,-0.2) 31(3.45,0.3) 32(3.45,0.8) 33(3.45,1.3) 34(3.45,1.8) 35(3.45,2.3) 36(3.45,2.8)
  oval 0.3x0.9 smd mask+0.05: 13(-2.725,-3.45) 14(-2.225,-3.45) 15(-1.725,-3.45) 16(-1.225,-3.45) 17(-0.725,-3.45) 18(-0.225,-3.45) 19(0.275,-3.45) 20(0.775,-3.45) 21(1.275,-3.45) 22(1.775,-3.45) 23(2.275,-3.45) 24(2.775,-3.45) 37(2.75,3.45) 38(2.25,3.45) 39(1.75,3.45) 40(1.25,3.45) 41(0.75,3.45) 42(0.25,3.45) 43(-0.25,3.45) 44(-0.75,3.45) 45(-1.25,3.45) 46(-1.75,3.45) 47(-2.25,3.45) 48(-2.75,3.45)
  rect 5.2x5.2 smd paste-10 mask+0.05: 49(0,0)
  silkscreen extent -4.31,-4.15 4.23,4.39, body extent -3.05,-3.05 3.05,3.05, height 0.9
RES0201 [mm]
  rect 0.28x0.32 smd mask+0.05: 1(-0.23,0) 2(0.23,0)
  silkscreen extent -0.5,-0.3 0.5,0.3, body extent -0.3,-0.15 0.3,0.15, height 0.23
RES0402 [mm]
  rect 0.51x0.54 smd mask+0.05: 1(-0.41,0) 2(0.41,0)
  silkscreen extent -0.85,-0.45 0.85,0.45, body extent -0.5,-0.25 0.5,0.25, height 0.35
RES0603 [mm]
  rect 0.76x0.76 smd mask+0.05: 1(-0.737,0) 2(0.738,0)
  silkscreen extent -1.3,-0.55 1.3,0.55, body extent -0.8,-0.4 0.8,0.4, height 0.46
TestPoint [mm]
  round 1 smd paste-10 mask+0.1: 1(0,0)
USB4105-GF-A [mm]
  oval 1x1.8 hole 0.6 slot 1.4 at 90 deg: 25(-4.32,-2.665) 25(4.32,-2.665)
  oval 1x2.1 hole 0.6 slot 1.7 at 90 deg: 25(-4.32,1.515) 25(4.32,1.515)
  rect 0.6x1.15 smd mask+0.05: A1/B12(-3.2,2.665) A4/B9(-2.4,2.665) B1/A12(3.2,2.665) B4/A9(2.4,2.665)
  rect 0.3x1.15 smd mask+0.05: A5(-1.25,2.665) A6(-0.25,2.665) A7(0.25,2.665) A8(1.25,2.665) B5(1.75,2.665) B6(0.75,2.665) B7(-0.75,2.665) B8(-1.75,2.665)
  silkscreen extent -4.42,-5.23 4.5,3.41, body extent -4.44,-5.23 4.5,2.47, height 3.26
VMK4-1EE-12-32K7680000TR [mm]
  rect 1x1.8 smd mask+0.05: 1(-1.273,-0.05) 2(1.227,-0.05)
  silkscreen extent -1.97,-1.15 1.93,1.05, body extent -1.62,-0.8 1.57,0.7, height 0.9
VXM7-1362-50M0000000 [mm]
  rect 1.3x1.1 smd: 1(-1.15,0.95) 2(1.15,0.95) 3(-1.15,-0.95) 4(1.15,-0.95)
  silkscreen extent -2.48,-1.7 2.05,1.68, body extent -1.66,-1.31 1.64,1.28, height 0.81
VXM8-9016-24M0000000 [mm]
  rect 0.575x0.575 smd: 1(-0.85,0.65) 2(0.85,0.65) 3(0.85,-0.65) 4(-0.85,-0.65)
  silkscreen extent -1.56,-1.1 1.33,1.13, body extent -1.33,-1.08 1.31,1.08, height 0.71